# Altium PCB ZYNQ_BOARD.PcbDoc (part 5 of 9)
Units mm, origin at the board's own origin, x right, y up, seen from the top; angles counter-clockwise.
Board outline 120 x 66 mm, 10 copper layers (Top Layer, Internal Plane 1 (GND), Middle Layer 1, Middle Layer 2, Internal Plane 2 (+1.0V), Middle Layer 3, Middle Layer 4, Middle Layer 5 (PWR), Internal Plane 3 (GND), Bottom Layer), stack 0.982 mm thick; 333 components, 331 nets, 1511 pads, 1077 vias.
Unrouted connection lines stored in the file: 30.
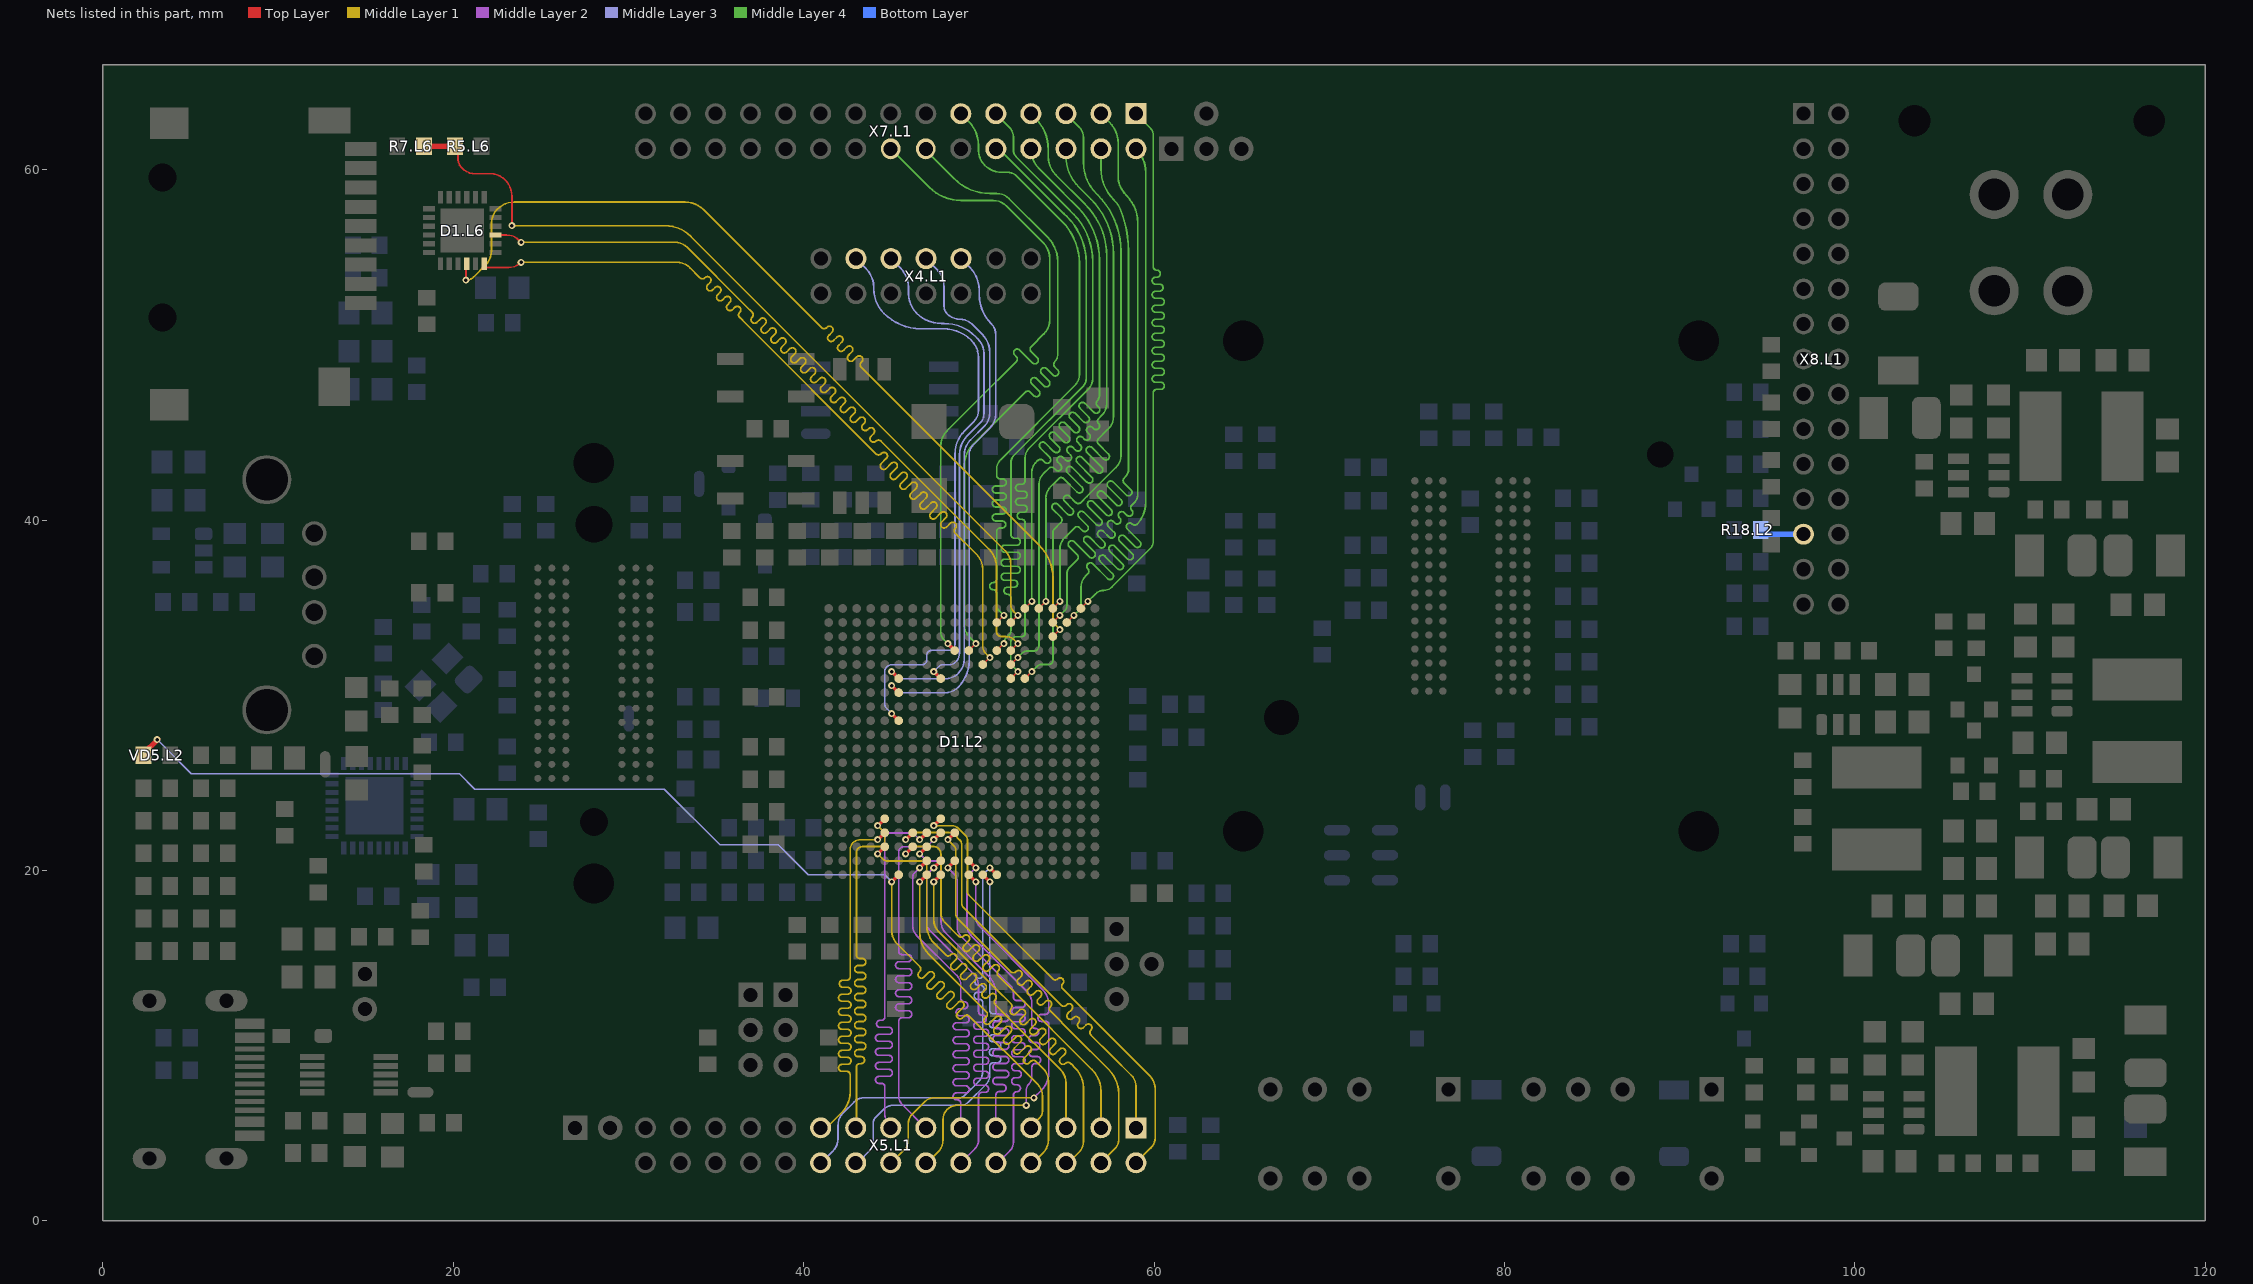
[diagram p13: the nets of this part, all layers, seen from the top]

## Via types
v1: diameter 0.4, hole 0.2, Top Layer to Bottom Layer, 1059 vias
v2: diameter 0.9, hole 0.6, Top Layer to Bottom Layer, 18 vias

## Nets (pads, with @x,y where several pads share a name; then routed paths per layer and width w, separated by ;. In a path a pad name is that pad's centre, name@x,y a point inside that pad or via, vN(x,y) a via of type N, cw(c..) or ccw(c..) an arc to the next point about the centre after c; other vN are vias at no path point) (continued)
ETH_RXCK_B501: D1.L2.B17 X7.L1.3 | length 39.3
  Top Layer w0.1: D1.L2.B17@54.22,34.16 v1(54.62,34.56)
  Middle Layer 4 w0.1: v1(54.62,34.56) 54.914,34.854 ccw(c54.658,35.11) 55.02,35.11 55.02,36.923 ; 55.02,36.924 cw(c55.577,36.924) 55.184,37.318 55.574,37.709 55.61,37.744 ccw(c55.468,37.885) 55.61,38.027 55.153,38.483 cw(c55.295,38.624) 55.153,38.766 cw(c55.295,38.624) 55.436,38.766 56.297,37.905 ccw(c56.439,38.046) 56.58,37.905 ccw(c56.439,38.046) 56.58,38.188 56.033,38.734 cw(c56.175,38.876) 56.316,39.017 56.863,38.47 ccw(c57.004,38.612) 57.146,38.47 ccw(c57.004,38.612) 57.146,38.753 56.825,39.074 cw(c56.966,39.216) 56.825,39.357 cw(c56.966,39.216) 57.108,39.357 57.429,39.036 ccw(c57.57,39.177) 57.711,39.036 ccw(c57.57,39.177) 57.711,39.319 57.39,39.64 cw(c57.532,39.781) 57.39,39.923 cw(c57.532,39.781) 57.673,39.923 57.757,39.839 ccw(c57.899,39.98) 58.04,40.122 58.014,40.148 cw(c58.155,40.289) 58.014,40.431 cw(c58.155,40.289) 58.297,40.431 58.438,40.289 ccw(c58.579,40.431) 58.721,40.289 ccw(c58.579,40.431) 58.721,40.572 cw(c58.862,40.714) 58.721,40.855 58.89,41.024 58.892,41.026 ccw(c58.47,41.444) 58.926,41.064 ccw(c58.47,41.444) 59.064,41.444 59.064,56.99 ccw(c56.895,56.99) 58.43,58.522 cw(c59.734,59.828) 58.029,59.122 cw(c58.924,59.492) 57.955,59.492 ; X7.L1.3@56.965,63.2 57.437,62.728 cw(c56.185,61.477) 57.955,61.477 57.955,59.493
ETH_RXCTL_B501: D1.L2.D13 X7.L1.10 | length 39.6
  Top Layer w0.1: D1.L2.D13@51.02,32.56 v1(51.42,32.96)
  Middle Layer 4 w0.1: X7.L1.10@50.965,60.985 X7.L1.10@50.965,61.2 cw(c50.965,60.753) 51.281,61.069 54.85,57.5 54.851,57.499 55.04,57.31 55.041,57.309 cw(c52.437,54.705) 56.12,54.705 56.12,48.072 cw(c55.529,48.072) 55.947,47.654 52,43.707 ccw(c52.42,43.287) 51.826,43.287 51.826,39.223 51.826,39.173 ccw(c52.026,39.173) 52.026,38.973 52.16,38.973 cw(c52.16,38.773) 52.16,38.573 51.471,38.573 ccw(c51.471,38.373) 51.471,38.173 52.16,38.173 cw(c52.16,37.973) 52.16,37.773 51.471,37.773 ccw(c51.471,37.573) 51.471,37.373 52.16,37.373 cw(c52.16,37.173) 52.16,36.973 51.471,36.973 ccw(c51.471,36.773) 51.471,36.573 52.005,36.573 cw(c52.005,36.373) 52.005,36.173 51.626,36.173 ccw(c51.626,35.973) 51.626,35.773 cw(c51.626,35.573) 51.826,35.573 51.826,35.288 51.826,33.683 cw(c51.524,33.683) 51.737,33.469 51.556,33.287 ccw(c51.883,32.96) v1(51.42,32.96) 51.398,33.012 v1@51.39,33.032
ETH_RXD0_B501: D1.L2.D11 X7.L1.14 | length 39.3
  Top Layer w0.1: D1.L2.D11@49.42,32.56 v1(49.82,32.96)
  Middle Layer 4 w0.1: X7.L1.14@46.965,61.2 ccw(c47.153,61.2) 47.02,61.067 48.601,59.486 ; v1(49.82,32.96) 49.82,32.965 49.436,33.349 cw(c50.066,33.979) 49.175,33.979 49.175,43.168 cw(c50.778,43.168) 49.644,44.301 52.334,46.991 52.652,47.309 cw(c52.793,47.167) 52.935,47.309 53.137,47.106 ccw(c53.279,47.248) 53.42,47.106 ccw(c53.279,47.248) 53.42,47.389 53.013,47.796 cw(c53.154,47.938) 53.013,48.079 cw(c53.154,47.938) 53.296,48.079 53.703,47.672 ccw(c53.845,47.813) 53.986,47.672 ccw(c53.845,47.813) 53.986,47.955 53.579,48.362 cw(c53.72,48.503) 53.579,48.645 cw(c53.72,48.503) 53.862,48.645 54.214,48.293 ccw(c54.355,48.434) 54.496,48.293 ccw(c54.355,48.434) 54.496,48.576 54.33,48.742 cw(c54.471,48.884) 54.304,48.994 54.437,49.195 54.454,49.24 ccw(c53.617,49.523) 54.47,49.294 ccw(c53.617,49.523) 54.5,49.523 54.5,54.758 ccw(c52.542,54.759) 53.926,56.145 51.711,58.36 ccw(c51.01,57.659) 51.01,58.65 50.619,58.65 ; 50.618,58.65 cw(c50.618,61.501) 48.602,59.485 ; 48.601,59.486 48.602,59.485
ETH_RXD1_B501: D1.L2.A16 X7.L1.6 | length 39.3
  Top Layer w0.1: D1.L2.A16@53.42,34.96 v1(53.82,35.36)
  Middle Layer 4 w0.1: v1(53.82,35.36) 53.82,41.251 cw(c54.771,41.251) 54.098,41.923 54.231,42.055 54.549,42.374 cw(c54.69,42.232) 54.832,42.374 55.595,41.611 ccw(c55.736,41.752) 55.878,41.611 ccw(c55.736,41.752) 55.878,41.893 55.049,42.722 cw(c55.19,42.863) 55.332,43.005 56.16,42.176 ccw(c56.302,42.318) 56.443,42.176 ccw(c56.302,42.318) 56.443,42.459 55.612,43.291 cw(c55.753,43.432) 55.612,43.573 cw(c55.753,43.432) 55.895,43.573 56.726,42.742 ccw(c56.868,42.883) 57.009,42.742 ccw(c56.868,42.883) 57.009,43.025 56.175,43.859 cw(c56.316,44.001) 56.175,44.142 cw(c56.316,44.001) 56.457,44.142 57.105,43.494 ccw(c57.247,43.635) 57.388,43.777 56.812,44.353 cw(c56.953,44.495) 56.812,44.636 57.331,45.156 57.383,45.208 ccw(c56.66,45.931) 57.683,45.931 57.683,55.202 ; X7.L1.6@54.965,61.2 54.965,60.797 ccw(c57.505,60.797) 55.709,59.001 56.392,58.317 56.394,58.315 cw(c53.28,55.203) 57.683,55.203
ETH_RXD2_B501: D1.L2.F15 X7.L1.5 | length 39.3
  Top Layer w0.1: D1.L2.F15@52.62,30.96 v1(53.02,31.36)
  Middle Layer 4 w0.1: v1(53.02,31.36) 53.321,31.661 cw(c53.56,31.422) 53.56,31.76 53.958,31.76 ccw(c53.959,32.033) 54.152,31.84 ccw(c53.984,32.006) 54.22,32.006 54.22,39.304 cw(c54.477,39.304) 54.295,39.485 54.649,39.839 54.684,39.874 ccw(c54.543,40.015) 54.684,40.157 54.223,40.618 cw(c54.364,40.76) 54.223,40.901 cw(c54.364,40.76) 54.506,40.901 55.057,40.349 ccw(c55.199,40.491) 55.34,40.349 ccw(c55.199,40.491) 55.34,40.632 54.888,41.084 cw(c55.029,41.226) 55.171,41.367 55.533,41.005 ccw(c55.674,41.147) 55.815,41.005 56.161,41.351 57.824,43.014 ccw(c57.147,43.692) 58.105,43.692 58.105,55.353 ; X7.L1.5@54.965,63.2 55.706,62.459 cw(c55.077,61.829) 55.967,61.829 55.967,60.425 ccw(c58.507,60.425) 56.711,58.629 56.774,58.566 56.775,58.565 cw(c53.564,55.354) 58.105,55.354
ETH_RXD3_B501: D1.L2.A15 X7.L1.8 | length 39.3
  Top Layer w0.1: D1.L2.A15@52.62,34.96 v1(53.02,35.36)
  Middle Layer 4 w0.1: X7.L1.8@52.965,61.2 ccw(c54.581,61.2) 53.438,60.057 54.844,58.652 54.846,58.65 55.631,57.865 55.633,57.863 cw(c52.618,54.85) 56.88,54.85 ; v1(53.02,35.36) 53.02,42.752 ; 53.02,42.753 cw(c53.778,42.753) 53.19,43.232 cw(c53.778,42.753) 53.223,43.27 53.243,43.29 53.366,43.413 cw(c53.508,43.272) 53.649,43.413 53.753,43.309 ccw(c53.895,43.451) 54.036,43.592 53.507,44.121 cw(c53.648,44.263) 53.507,44.404 cw(c53.648,44.263) 53.79,44.404 54.28,43.914 ccw(c54.421,44.056) 54.562,43.914 ccw(c54.421,44.056) 54.562,44.197 54.073,44.687 cw(c54.214,44.828) 54.073,44.97 cw(c54.214,44.828) 54.355,44.97 54.842,44.483 ccw(c54.984,44.624) 55.125,44.483 ccw(c54.984,44.624) 55.125,44.766 54.638,45.253 cw(c54.78,45.394) 54.638,45.536 cw(c54.78,45.394) 54.921,45.536 55.405,45.052 ccw(c55.546,45.193) 55.688,45.335 55.204,45.818 cw(c55.345,45.96) 55.204,46.101 cw(c55.345,45.96) 55.487,46.101 55.967,45.621 ccw(c56.109,45.762) 56.25,45.621 ccw(c56.109,45.762) 56.25,45.904 55.77,46.384 cw(c55.911,46.526) 55.77,46.667 cw(c55.911,46.526) 56.052,46.667 56.554,46.165 ccw(c56.695,46.307) 56.837,46.165 ccw(c56.695,46.307) 56.837,46.448 56.758,46.527 cw(c56.9,46.668) 56.751,46.802 56.758,46.81 ccw(c56.329,47.155) 56.788,46.85 ccw(c56.329,47.155) 56.88,47.155 56.88,54.849
ETH_RXER_B501: D1.L2.B13 X7.L1.11 | length 39.3
  Top Layer w0.1: D1.L2.B13@51.02,34.16 v1(51.42,34.56)
  Middle Layer 4 w0.1: X7.L1.11@48.965,63.2 49.411,62.754 49.412,62.753 ; 49.412,62.753 cw(c48.064,61.405) 49.97,61.406 ; 49.97,61.404 49.97,61.115 ccw(c51.165,61.115) 50.32,60.27 ccw(c51.323,61.273) 51.323,59.855 51.626,59.855 cw(c51.626,59.097) 52.162,59.633 54.751,57.044 cw(c52.383,54.675) 55.732,54.675 ; v1(51.42,34.56) 51.159,34.821 cw(c51.518,35.18) 51.01,35.18 51.01,35.786 51.01,35.836 ccw(c50.81,35.836) 50.81,36.036 cw(c50.81,36.236) 50.81,36.436 ccw(c50.81,36.636) 51.01,36.636 51.01,37.26 51.01,38.207 51.01,39.356 cw(c51.21,39.356) 51.21,39.556 51.327,39.556 ccw(c51.327,39.756) 51.327,39.956 50.963,39.956 cw(c50.963,40.156) 50.963,40.356 51.357,40.356 ccw(c51.357,40.556) 51.357,40.756 50.963,40.756 cw(c50.963,40.956) 50.963,41.156 51.357,41.156 ccw(c51.357,41.356) 51.357,41.556 50.963,41.556 cw(c50.963,41.756) 50.963,41.956 51.357,41.956 ccw(c51.357,42.156) 51.357,42.356 51.21,42.356 cw(c51.21,42.556) 51.01,42.556 51.01,42.606 51.01,42.898 cw(c51.803,42.899) 51.243,43.46 55.47,47.686 ccw(c54.836,48.32) 55.732,48.32 55.732,54.674
ETH_TXCK_B501: D1.L2.A19 X7.L1.1 | length 39.3
  Top Layer w0.1: D1.L2.A19@55.82,34.96 v1(56.22,35.36)
  Middle Layer 4 w0.1: v1(56.22,35.36) 56.666,35.806 cw(c57.11,35.362) 57.11,35.99 ccw(c57.11,36.668) 57.589,36.189 59.764,38.363 ccw(c59.307,38.82) 59.953,38.82 59.953,46.82 59.953,47.27 cw(c60.153,47.27) 60.153,47.47 60.379,47.47 ccw(c60.379,47.67) 60.379,47.87 60.084,47.87 cw(c60.084,48.07) 60.084,48.27 60.379,48.27 ccw(c60.379,48.47) 60.379,48.67 60.084,48.67 cw(c60.084,48.87) 60.084,49.07 60.379,49.07 ccw(c60.379,49.27) 60.379,49.47 60.084,49.47 cw(c60.084,49.67) 60.084,49.87 60.379,49.87 ccw(c60.379,50.07) 60.379,50.27 60.084,50.27 cw(c60.084,50.47) 60.084,50.67 60.379,50.67 ccw(c60.379,50.87) 60.379,51.07 60.084,51.07 cw(c60.084,51.27) 60.084,51.47 60.379,51.47 ccw(c60.379,51.67) 60.379,51.87 60.084,51.87 cw(c60.084,52.07) 60.084,52.27 60.379,52.27 ccw(c60.379,52.47) 60.379,52.67 60.084,52.67 cw(c60.084,52.87) 60.084,53.07 60.309,53.07 ccw(c60.309,53.27) 60.309,53.47 60.084,53.47 cw(c60.084,53.67) 60.084,53.87 60.153,53.87 ccw(c60.153,54.07) 60.153,54.27 cw(c60.153,54.47) 59.953,54.47 59.953,57.459 59.953,61.963 ccw(c59.354,61.963) 59.778,62.387 X7.L1.1@58.965,63.2
ETH_TXCTL_B501: D1.L2.F14 X7.L1.9 | length 39.3
  Top Layer w0.1: D1.L2.F14@51.82,30.96 v1(52.22,31.36)
  Middle Layer 4 w0.1: X7.L1.9@50.965,63.2 51.733,62.432 cw(c51.161,61.86) 51.97,61.86 51.97,61.108 ; 51.97,61.107 ccw(c52.468,61.107) 52.116,60.755 ; 52.117,60.754 55.042,57.829 55.043,57.828 55.42,57.451 cw(c52.59,54.76) 56.495,54.76 ; v1(52.22,31.36) 51.947,31.633 cw(c52.255,31.94) 51.82,31.94 51.82,33.067 cw(c52.093,33.067) 51.9,33.26 cw(c52.115,33.045) 52.115,33.349 52.433,33.349 ccw(c52.433,33.557) 52.58,33.41 ccw(c52.449,33.541) 52.634,33.541 52.634,39.241 52.634,39.851 ccw(c52.434,39.851) 52.434,40.051 52.382,40.051 cw(c52.382,40.251) 52.382,40.451 52.55,40.451 ccw(c52.55,40.651) 52.55,40.851 52.293,40.851 cw(c52.293,41.051) 52.293,41.251 52.55,41.251 ccw(c52.55,41.451) 52.55,41.651 52.293,41.651 cw(c52.293,41.851) 52.293,42.051 52.434,42.051 ccw(c52.434,42.251) 52.634,42.251 52.634,42.701 52.634,43.542 ; 52.634,43.543 cw(c53.448,43.543) 52.873,44.12 56.262,47.508 ccw(c55.698,48.072) 56.495,48.072 56.495,54.759
ETH_TXD0_B501: D1.L2.E14 X7.L1.7 | length 39.3
  Top Layer w0.1: D1.L2.E14@51.82,31.76 v1(52.22,32.16)
  Middle Layer 4 w0.1: v1(52.22,32.16) 52.487,32.427 cw(c52.76,32.154) 52.76,32.54 53.175,32.54 ccw(c53.175,32.745) 53.32,32.6 ccw(c53.054,32.866) 53.43,32.866 53.43,42.06 cw(c54.251,42.06) 53.67,42.64 53.68,42.65 53.998,42.968 cw(c54.139,42.826) 54.281,42.968 54.377,42.871 ccw(c54.519,43.012) 54.66,42.871 ccw(c54.519,43.012) 54.66,43.154 54.511,43.303 cw(c54.653,43.444) 54.794,43.586 54.943,43.437 ccw(c55.085,43.578) 55.226,43.437 ccw(c55.085,43.578) 55.226,43.719 55.075,43.871 cw(c55.216,44.012) 55.075,44.153 cw(c55.216,44.012) 55.358,44.153 55.509,44.002 ccw(c55.65,44.144) 55.792,44.002 ccw(c55.65,44.144) 55.792,44.285 55.638,44.439 cw(c55.779,44.58) 55.638,44.722 cw(c55.779,44.58) 55.921,44.722 56.016,44.626 ccw(c56.158,44.768) 56.299,44.909 56.201,45.007 cw(c56.342,45.149) 56.201,45.29 cw(c56.342,45.149) 56.484,45.29 56.543,45.231 ccw(c56.685,45.372) 56.826,45.231 ccw(c56.685,45.372) 56.826,45.513 cw(c56.968,45.655) 56.826,45.796 57.017,45.987 57.073,46.049 57.122,46.112 ccw(c56.354,46.65) 57.15,46.155 ccw(c56.354,46.65) 57.292,46.65 57.292,55.074 ; X7.L1.7@52.965,63.2 53.216,62.949 cw(c51.42,61.153) 53.96,61.153 53.96,60.744 ccw(c55.435,60.744) 54.392,59.701 56.07,58.024 56.071,58.022 cw(c53.123,55.075) 57.292,55.075
ETH_TXD1_B501: D1.L2.B18 X7.L1.2 | length 39.3
  Top Layer w0.1: D1.L2.B18@55.02,34.16 v1(55.42,34.56)
  Middle Layer 4 w0.1: v1(55.42,34.56) 55.681,34.821 ; 55.682,34.822 ccw(c55.323,35.18) 55.83,35.18 55.83,36.17 cw(c56.76,36.17) 56.102,36.828 56.182,36.908 56.218,36.943 ccw(c56.076,37.085) 56.218,37.226 cw(c56.359,37.368) 56.218,37.509 cw(c56.359,37.368) 56.5,37.509 57.34,36.669 ccw(c57.482,36.811) 57.623,36.669 ccw(c57.482,36.811) 57.623,36.952 56.908,37.667 cw(c57.049,37.808) 57.191,37.95 57.906,37.235 ccw(c58.047,37.376) 58.189,37.235 ccw(c58.047,37.376) 58.189,37.518 57.474,38.233 cw(c57.615,38.374) 57.474,38.515 cw(c57.615,38.374) 57.757,38.515 58.472,37.8 ccw(c58.613,37.942) 58.754,37.8 ccw(c58.613,37.942) 58.754,38.083 58.039,38.798 cw(c58.181,38.94) 58.039,39.081 cw(c58.181,38.94) 58.322,39.081 58.901,38.502 ccw(c59.043,38.644) 59.184,38.785 58.471,39.498 cw(c58.613,39.639) 58.471,39.78 cw(c58.613,39.639) 58.754,39.78 ccw(c58.896,39.922) 59.051,39.795 59.207,39.987 59.224,40.013 ccw(c57.62,41.036) 59.251,40.057 ccw(c57.62,41.036) 59.522,41.036 59.522,59.855 ccw(c57.62,59.855) X7.L1.2@58.965,61.2 ; X7.L1.2@58.965,60.968 X7.L1.2@58.965,61.027
ETH_TXD2_B501: D1.L2.D10 X7.L1.16 | length 39.3
  Top Layer w0.2: v1(48.22,32.96) D1.L2.D10@48.62,32.56
  Middle Layer 4 w0.1: X7.L1.16@44.965,61.2 47.17,58.995 ccw(c48.966,60.791) 48.966,58.251 50.807,58.251 cw(c50.807,57.182) 51.562,57.938 53.67,55.83 cw(c52.777,54.937) 54.04,54.937 54.04,51.43 cw(c52.91,51.43) 53.709,50.631 53.015,49.937 52.98,49.902 ccw(c53.121,49.76) 52.98,49.619 53.331,49.268 cw(c53.19,49.126) 53.331,48.985 cw(c53.19,49.126) 53.048,48.985 52.323,49.71 ccw(c52.182,49.569) 52.04,49.71 ccw(c52.182,49.569) 52.04,49.427 52.131,49.336 cw(c51.99,49.195) 52.131,49.053 49.97,46.892 48.178,45.1 ccw(c49.05,44.229) 47.818,44.229 47.818,33.625 ccw(c48.451,33.625) 48.003,33.177 v1(48.22,32.96)
ETH_TXD3_B501: D1.L2.A17 X7.L1.4 | length 39.3
  Top Layer w0.1: D1.L2.A17@54.22,34.96 v1(54.62,35.36)
  Middle Layer 4 w0.1: v1(54.62,35.36) 54.62,38.349 ; 54.62,38.35 cw(c55.549,38.35) 54.893,39.008 55.089,39.204 55.459,39.574 cw(c55.6,39.432) 55.742,39.574 55.904,39.412 ccw(c56.045,39.553) 56.186,39.412 ccw(c56.045,39.553) 56.186,39.694 ; 56.186,39.694 55.714,40.167 cw(c55.855,40.309) 55.997,40.45 56.695,39.752 ccw(c56.837,39.893) 56.978,39.752 ccw(c56.837,39.893) 56.978,40.034 56.247,40.766 cw(c56.388,40.907) 56.247,41.049 cw(c56.388,40.907) 56.529,41.049 57.261,40.317 ccw(c57.402,40.459) 57.544,40.317 ccw(c57.402,40.459) 57.544,40.6 56.812,41.331 cw(c56.954,41.473) 56.812,41.614 cw(c56.954,41.473) 57.095,41.614 57.826,40.883 ccw(c57.968,41.024) 58.109,41.166 57.378,41.897 cw(c57.519,42.039) 57.378,42.18 cw(c57.519,42.039) 57.661,42.18 58.392,41.449 ccw(c58.534,41.59) 58.675,41.449 ccw(c58.534,41.59) 58.675,41.731 58.287,42.119 cw(c58.429,42.261) 58.287,42.402 58.323,42.437 58.358,42.473 ccw(c57.926,42.906) 58.538,42.906 58.538,55.358 ccw(c52.273,55.358) 58.061,57.754 ccw(c56.646,57.167) 57.729,58.251 57.709,58.271 cw(c59.505,60.067) 56.965,60.067 X7.L1.4@56.965,61.2
FPGA_BANK13.IO_L6N_T0_VREF_13: D1.L2.V5 X5.L1.5 | length 26.5
  Top Layer w0.2: v1(44.22,20.96) D1.L2.V5@44.62,21.36
  Middle Layer 1 w0.1: v1(44.22,20.96) 44.545,20.635 ccw(c44.75,20.84) 44.75,20.55 46.689,20.55 ; 46.69,20.55 cw(c46.69,20.234) 46.913,20.458 ; 46.914,20.457 cw(c46.655,20.2) 47.02,20.2 ; 47.02,20.199 47.02,16.86 ccw(c48.45,16.86) 47.439,15.849 48.068,15.22 48.103,15.185 ccw(c48.244,15.326) 48.386,15.185 48.394,15.193 cw(c48.535,15.051) 48.677,15.193 cw(c48.535,15.051) 48.677,14.91 48.443,14.677 ccw(c48.585,14.535) 48.443,14.394 ccw(c48.585,14.535) 48.726,14.394 48.96,14.627 cw(c49.101,14.486) 49.242,14.627 cw(c49.101,14.486) 49.242,14.344 49.009,14.111 ccw(c49.15,13.969) 49.009,13.828 ccw(c49.15,13.969) 49.292,13.828 49.525,14.061 cw(c49.667,13.92) 49.808,14.061 cw(c49.667,13.92) 49.808,13.779 49.575,13.545 ccw(c49.716,13.404) 49.575,13.262 ccw(c49.716,13.404) 49.858,13.262 50.082,13.487 cw(c50.224,13.346) 50.365,13.487 cw(c50.224,13.346) 50.365,13.204 50.224,13.063 ccw(c50.366,12.922) 50.224,12.78 ccw(c50.366,12.922) 50.507,12.78 50.649,12.922 cw(c50.79,12.781) 50.931,12.922 cw(c50.79,12.781) 50.931,12.639 ccw(c51.073,12.498) 50.931,12.356 51.623,11.665 54.667,8.621 cw(c53.947,7.901) 54.965,7.901 X5.L1.5@54.965,5.32
FPGA_BANK13.IO_L11N_T1_SRCC_13: D1.L2.V7 X5.L1.3 | length 26.4
  Top Layer w0.2: v1(45.82,20.96) D1.L2.V7@46.22,21.36
  Middle Layer 1 w0.1: v1(45.82,20.96) 46.187,21.327 cw(c46.291,21.223) 46.291,21.37 47.438,21.37 ; 47.439,21.37 cw(c47.439,21.009) 47.693,21.265 cw(c47.367,20.937) 47.83,20.937 ; 47.83,20.936 47.83,17.581 ccw(c48.592,17.58) 48.053,17.041 ; 48.054,17.04 48.8,16.294 48.835,16.259 ccw(c48.977,16.4) 49.118,16.259 49.128,16.269 cw(c49.27,16.128) 49.411,16.269 cw(c49.27,16.128) 49.411,15.986 49.151,15.726 ccw(c49.292,15.584) 49.151,15.443 ccw(c49.292,15.584) 49.434,15.443 49.694,15.703 cw(c49.835,15.562) 49.977,15.703 cw(c49.835,15.562) 49.977,15.421 49.716,15.16 ccw(c49.858,15.019) 49.716,14.877 ccw(c49.858,15.019) 49.999,14.877 50.26,15.138 cw(c50.401,14.996) 50.543,15.138 cw(c50.401,14.996) 50.543,14.855 50.282,14.594 ccw(c50.424,14.453) 50.282,14.312 ccw(c50.424,14.453) 50.565,14.312 50.825,14.572 cw(c50.967,14.431) 51.108,14.572 cw(c50.967,14.431) 51.108,14.289 51.098,14.279 ccw(c51.24,14.138) 51.098,13.996 51.919,13.176 56.447,8.648 cw(c55.195,7.396) 56.965,7.396 X5.L1.3@56.965,5.32
FPGA_BANK13.IO_L11P_T1_SRCC_13: D1.L2.U7 X5.L1.1 | length 26.5
  Top Layer w0.2: v1(45.82,21.76) D1.L2.U7@46.22,22.16
  Middle Layer 1 w0.1: v1(45.82,21.76) 46.117,22.057 cw(c46.39,21.784) 46.39,22.17 48.31,22.17 cw(c48.31,21.748) 48.609,22.046 48.913,21.742 48.914,21.741 cw(c48.677,21.504) 49.012,21.504 ; 49.012,21.503 49.012,18.156 ccw(c49.393,18.156) 49.123,17.887 54.66,12.35 54.695,12.315 ccw(c54.837,12.456) 54.978,12.315 55.004,12.341 cw(c55.145,12.199) 55.287,12.341 cw(c55.145,12.199) 55.287,12.058 55.076,11.847 ccw(c55.217,11.706) 55.076,11.564 ccw(c55.217,11.706) 55.359,11.564 55.402,11.608 cw(c55.544,11.466) 55.685,11.608 cw(c55.544,11.466) 55.685,11.325 ccw(c55.826,11.183) 55.685,11.042 ccw(c55.826,11.183) 55.968,11.042 56.109,11.184 cw(c56.251,11.042) 56.392,11.184 cw(c56.251,11.042) 56.392,10.901 ccw(c56.534,10.759) 56.392,10.618 57.646,9.364 58.707,8.303 cw(c58.084,7.68) 58.965,7.68 X5.L1.1@58.965,5.32
FPGA_BANK13.IO_L12N_T1_MRCC_13: D1.L2.U10 X5.L1.4 | length 26.5
  Top Layer w0.2: v1(48.22,21.76) D1.L2.U10@48.62,22.16
  Middle Layer 1 w0.1: v1(48.22,21.76) 48.589,21.391 48.59,21.39 cw(c48.385,21.185) 48.675,21.185 ; 48.675,21.184 48.675,17.552 ccw(c49.102,17.552) 48.8,17.25 51.79,14.26 51.825,14.225 ccw(c51.967,14.366) 52.108,14.225 52.122,14.238 cw(c52.263,14.097) 52.405,14.238 cw(c52.263,14.097) 52.405,13.955 52.243,13.794 ccw(c52.385,13.653) 52.243,13.511 ccw(c52.385,13.653) 52.526,13.511 52.687,13.672 cw(c52.829,13.531) 52.97,13.672 cw(c52.829,13.531) 52.97,13.39 52.809,13.228 ccw(c52.951,13.087) 52.809,12.946 ccw(c52.951,13.087) 53.092,12.946 53.238,13.091 cw(c53.379,12.95) 53.52,13.091 cw(c53.379,12.95) 53.52,12.808 53.381,12.669 ccw(c53.522,12.528) 53.381,12.386 ccw(c53.522,12.528) 53.664,12.386 53.805,12.528 cw(c53.947,12.386) 54.088,12.528 cw(c53.947,12.386) 54.088,12.245 ; 54.088,12.245 ccw(c54.23,12.103) 54.088,11.962 55.355,10.695 57.407,8.643 cw(c56.024,7.26) 57.98,7.26 57.98,4.644 cw(c57.233,4.644) 57.761,4.116 X5.L1.4@56.965,3.32
FPGA_BANK13.IO_L12P_T1_MRCC_13: D1.L2.T9 X5.L1.2 | length 26.6
  Top Layer w0.2: v1(47.42,22.56) D1.L2.T9@47.82,22.96
  Middle Layer 1 w0.1: v1(47.42,22.56) 48.46,22.56 cw(c48.46,22.04) 48.827,22.408 49.216,22.019 49.218,22.018 cw(c48.898,21.698) 49.35,21.698 ; 49.35,21.697 49.35,18.78 ccw(c49.594,18.78) 49.422,18.607 52.392,15.637 54.213,13.816 ccw(c54.354,13.957) 54.496,13.816 cw(c54.637,13.675) 54.779,13.816 cw(c54.637,13.675) 54.779,13.533 ccw(c54.92,13.392) 54.779,13.25 55.097,12.932 59.739,8.29 cw(c58.961,7.514) 60.06,7.514 60.06,4.76 cw(c59.227,4.76) 59.816,4.171 X5.L1.2@58.965,3.32
FPGA_BANK13.IO_L13N_T2_MRCC_13: D1.L2.Y6 VD5.L2.2 X5.L1.7 | length 70.7
  Top Layer w0.2: v1(45.02,19.36) D1.L2.Y6@45.42,19.76
  Top Layer w0.3: VD5.L2.2@2.32,26.68 v1@3.14,27.5
  Middle Layer 3 w0.1: v1(3.09,27.48) 5.04,25.53 20.348,25.53 21.23,24.648 32.04,24.648 35.218,21.471 38.54,21.471 40.255,19.756 44.624,19.756 v1(45.02,19.36)
  Middle Layer 1 w0.1: 45.02,16.553 ccw(c46.054,16.553) 45.323,15.822 ; 45.02,16.554 v1(45.02,19.36) ; X5.L1.7@52.965,5.32 cw(c53.146,5.32) 53.018,5.448 53.49,5.92 ccw(c53.164,6.246) 53.625,6.246 53.625,7.127 ccw(c52.677,7.127) 53.347,7.797 49.485,11.66 49.449,11.696 ccw(c49.308,11.554) 49.167,11.696 49.064,11.593 cw(c48.923,11.735) 48.781,11.593 cw(c48.923,11.735) 48.781,11.876 49.095,12.19 ccw(c48.953,12.331) 49.095,12.472 ccw(c48.953,12.331) 48.812,12.472 48.498,12.159 cw(c48.357,12.3) 48.216,12.159 cw(c48.357,12.3) 48.216,12.442 48.529,12.755 ccw(c48.388,12.897) 48.529,13.038 ccw(c48.388,12.897) 48.246,13.038 47.933,12.724 cw(c47.791,12.866) 47.65,12.724 cw(c47.791,12.866) 47.65,13.007 47.964,13.321 ccw(c47.822,13.462) 47.964,13.604 ccw(c47.822,13.462) 47.681,13.604 47.367,13.29 cw(c47.226,13.432) 47.084,13.29 cw(c47.226,13.432) 47.084,13.573 47.398,13.887 ccw(c47.256,14.028) 47.398,14.17 ccw(c47.256,14.028) 47.115,14.17 46.86,13.915 cw(c46.719,14.056) 46.577,13.915 cw(c46.719,14.056) 46.577,14.198 46.621,14.241 ccw(c46.48,14.383) 46.621,14.524 45.909,15.236 45.324,15.821 ; 45.323,15.822 45.324,15.821
FPGA_BANK13.IO_L14N_T2_SRCC_13: D1.L2.Y8 X5.L1.8 | length 26.5
  Top Layer w0.2: v1(46.62,19.36) D1.L2.Y8@47.02,19.76
  Middle Layer 1 w0.1: v1(46.62,19.36) 46.62,16.464 ccw(c48.364,16.464) 47.131,15.231 50.103,12.259 50.421,11.94 cw(c50.28,11.799) 50.421,11.658 50.335,11.571 ccw(c50.476,11.429) 50.335,11.288 ccw(c50.476,11.429) 50.617,11.288 50.958,11.629 cw(c51.1,11.487) 51.241,11.629 cw(c51.1,11.487) 51.241,11.346 50.9,11.005 ccw(c51.042,10.864) 50.9,10.722 ccw(c51.042,10.864) 51.183,10.722 51.524,11.063 cw(c51.665,10.922) 51.807,11.063 cw(c51.665,10.922) 51.807,10.78 51.466,10.439 ccw(c51.607,10.298) 51.466,10.157 ccw(c51.607,10.298) 51.749,10.157 52.089,10.497 cw(c52.231,10.356) 52.372,10.497 cw(c52.231,10.356) 52.372,10.214 52.032,9.874 ccw(c52.173,9.732) 52.032,9.591 ccw(c52.173,9.732) 52.315,9.591 52.655,9.932 cw(c52.797,9.79) 52.938,9.932 cw(c52.797,9.79) 52.938,9.649 52.597,9.308 ccw(c52.739,9.167) 52.597,9.025 ccw(c52.739,9.167) 52.88,9.025 52.967,9.112 cw(c53.108,8.971) 53.25,9.112 53.671,8.691 53.775,8.569 cw(c52.949,7.969) 53.804,8.527 cw(c52.949,7.969) 53.97,7.969 53.97,4.633 cw(c52.877,4.633) 53.65,3.86 53.213,3.423 cw(c52.965,3.67) X5.L1.8@52.965,3.32 X5.L1.8@53.12,3.32
FPGA_BANK13.IO_L14P_T2_SRCC_13: D1.L2.Y9 X5.L1.6 | length 26.5
  Top Layer w0.2: v1(47.42,19.36) D1.L2.Y9@47.82,19.76
  Middle Layer 1 w0.1: v1(47.42,19.36) 47.42,17.179 ccw(c48.327,17.179) 47.686,16.538 50.936,13.287 51.828,12.395 cw(c51.687,12.254) 51.828,12.112 ccw(c51.97,11.971) 51.828,11.829 ccw(c51.97,11.971) 52.111,11.829 52.312,12.03 cw(c52.453,11.888) 52.594,12.03 cw(c52.453,11.888) 52.594,11.747 52.392,11.545 ccw(c52.534,11.403) 52.392,11.262 ccw(c52.534,11.403) 52.675,11.262 52.911,11.498 cw(c53.053,11.357) 53.194,11.498 cw(c53.053,11.357) 53.194,11.215 52.958,10.979 ccw(c53.099,10.838) 52.958,10.696 ccw(c53.099,10.838) 53.241,10.696 53.477,10.932 cw(c53.618,10.791) 53.76,10.932 cw(c53.618,10.791) 53.76,10.65 53.524,10.413 ccw(c53.665,10.272) 53.524,10.13 ccw(c53.665,10.272) 53.806,10.13 54.043,10.367 cw(c54.184,10.225) 54.326,10.367 cw(c54.184,10.225) 54.326,10.084 54.089,9.848 ccw(c54.231,9.706) 54.089,9.565 ccw(c54.231,9.706) 54.372,9.565 54.608,9.801 cw(c54.75,9.66) 54.891,9.801 cw(c54.75,9.66) 54.891,9.518 54.655,9.282 ccw(c54.796,9.14) 54.655,8.999 ccw(c54.796,9.14) 54.938,8.999 54.94,9.001 cw(c55.081,8.86) 55.223,9.001 55.258,8.966 55.5,8.723 cw(c54.365,7.589) 55.97,7.589 55.97,4.548 cw(c55.082,4.548) 55.71,3.92 55.213,3.423 cw(c54.965,3.67) X5.L1.6@54.965,3.32
FPGA_BANK13.IO_L15N_T2_DQS_13: D1.L2.W8 X5.L1.11 | length 26.4
  Top Layer w0.2: v1(46.62,20.16) D1.L2.W8@47.02,20.56
  Middle Layer 2 w0.1: 46.22,16.828 ccw(c46.939,16.828) 46.43,16.319 46.431,16.319 48.74,14.01 cw(c48.197,13.467) 48.965,13.467 48.965,13.11 48.965,12.713 ccw(c49.165,12.713) 49.165,12.513 cw(c49.165,12.313) 49.165,12.113 48.895,12.113 ccw(c48.895,11.913) 48.895,11.713 49.243,11.713 cw(c49.243,11.513) 49.243,11.313 48.725,11.313 ccw(c48.725,11.113) 48.725,10.913 49.243,10.913 cw(c49.243,10.713) 49.243,10.513 48.725,10.513 ccw(c48.725,10.313) 48.725,10.113 49.243,10.113 cw(c49.243,9.913) 49.243,9.713 48.725,9.713 ccw(c48.725,9.513) 48.725,9.313 49.243,9.313 cw(c49.243,9.113) 49.243,8.913 48.725,8.913 ccw(c48.725,8.713) 48.725,8.513 49.243,8.513 cw(c49.243,8.313) 49.243,8.113 48.725,8.113 ccw(c48.725,7.913) 48.725,7.713 49.243,7.713 cw(c49.243,7.513) 49.243,7.313 48.725,7.313 ccw(c48.725,7.113) 48.725,6.913 48.765,6.913 cw(c48.765,6.713) 48.965,6.713 48.965,6.663 X5.L1.11@48.965,5.32 ; 46.22,16.829 46.22,19.64 cw(c46.51,19.64) 46.305,19.845 v1(46.62,20.16)
FPGA_BANK13.IO_L15P_T2_DQS_13: D1.L2.V8 X5.L1.9 | length 26.4
  Top Layer w0.2: v1(46.62,20.96) D1.L2.V8@47.02,21.36
  Middle Layer 2 w0.1: v1(46.62,20.96) 46.959,20.621 ccw(c47.13,20.791) 47.13,20.55 47.591,20.55 cw(c47.591,20.311) 47.76,20.48 cw(c47.588,20.308) 47.831,20.308 47.831,17.117 ccw(c48.817,17.117) 48.12,16.42 50.535,14.005 cw(c49.497,12.967) 50.965,12.967 50.965,12.039 50.965,11.989 ccw(c51.165,11.989) 51.165,11.789 51.503,11.789 cw(c51.503,11.589) 51.503,11.389 50.998,11.389 ccw(c50.998,11.189) 50.998,10.989 51.503,10.989 cw(c51.503,10.789) 51.503,10.589 50.998,10.589 ccw(c50.998,10.389) 50.998,10.189 51.503,10.189 cw(c51.503,9.989) 51.503,9.789 50.998,9.789 ccw(c50.998,9.589) 50.998,9.389 51.503,9.389 cw(c51.503,9.189) 51.503,8.989 50.998,8.989 ccw(c50.998,8.789) 50.998,8.589 51.503,8.589 cw(c51.503,8.389) 51.503,8.189 50.998,8.189 ccw(c50.998,7.989) 50.998,7.789 51.346,7.789 cw(c51.346,7.589) 51.346,7.389 51.165,7.389 ccw(c51.165,7.189) 50.965,7.189 50.965,6.783 X5.L1.9@50.965,5.32
FPGA_BANK13.IO_L16N_T2_13: D1.L2.W9 X5.L1.12 | length 26.4
  Top Layer w0.2: v1(47.42,20.16) D1.L2.W9@47.82,20.56
  Middle Layer 2 w0.1: v1(47.42,20.16) 47.105,19.845 ccw(c47.31,19.64) 47.02,19.64 47.02,16.992 ccw(c47.532,16.992) 47.17,16.63 49.661,14.139 cw(c48.891,13.369) 49.98,13.369 49.98,12.3 49.98,11.944 ccw(c50.18,11.944) 50.18,11.744 50.213,11.744 cw(c50.213,11.544) 50.213,11.344 49.903,11.344 ccw(c49.903,11.144) 49.903,10.944 50.353,10.944 cw(c50.353,10.744) 50.353,10.544 49.903,10.544 ccw(c49.903,10.344) 49.903,10.144 50.353,10.144 cw(c50.353,9.944) 50.353,9.744 49.903,9.744 ccw(c49.903,9.544) 49.903,9.344 50.353,9.344 cw(c50.353,9.144) 50.353,8.944 49.903,8.944 ccw(c49.903,8.744) 49.903,8.544 50.353,8.544 cw(c50.353,8.344) 50.353,8.144 49.903,8.144 ccw(c49.903,7.944) 49.903,7.744 50.353,7.744 cw(c50.353,7.544) 50.353,7.344 50.18,7.344 ccw(c50.18,7.144) 49.98,7.144 49.98,6.694 49.98,4.63 cw(c49.268,4.63) 49.771,4.126 X5.L1.12@48.965,3.32
FPGA_BANK13.IO_L16P_T2_13: D1.L2.W10 X5.L1.10 | length 26.4
  Top Layer w0.2: v1(48.22,20.16) D1.L2.W10@48.62,20.56
  Middle Layer 2 w0.1: v1(48.22,20.16) 48.612,19.768 cw(c48.253,19.41) 48.76,19.41 48.76,16.767 ; 48.76,16.766 ccw(c49.496,16.766) 48.976,16.245 ; 48.976,16.245 51.761,13.46 51.762,13.459 cw(c51.267,12.964) 51.967,12.964 51.967,12.828 51.967,12.778 ccw(c52.167,12.778) 52.167,12.578 52.432,12.578 cw(c52.432,12.378) 52.432,12.178 52.07,12.178 ccw(c52.07,11.978) 52.07,11.778 52.432,11.778 cw(c52.432,11.578) 52.432,11.378 52.07,11.378 ccw(c52.07,11.178) 52.07,10.978 52.432,10.978 cw(c52.432,10.778) 52.432,10.578 52.07,10.578 ccw(c52.07,10.378) 52.07,10.178 52.432,10.178 cw(c52.432,9.978) 52.432,9.778 52.07,9.778 ccw(c52.07,9.578) 52.07,9.378 52.432,9.378 cw(c52.432,9.178) 52.432,8.978 52.07,8.978 ccw(c52.07,8.778) 52.07,8.578 52.218,8.578 cw(c52.218,8.378) 52.218,8.178 52.07,8.178 ccw(c52.07,7.978) 52.07,7.778 52.167,7.778 cw(c52.167,7.578) 52.167,7.378 ccw(c52.167,7.178) 51.967,7.178 51.967,6.514 51.967,4.485 cw(c51.295,4.485) 51.77,4.01 51.161,3.401 cw(c50.965,3.598) X5.L1.10@50.965,3.32
FPGA_BANK13.IO_L17N_T2_13: D1.L2.U8 X5.L1.15 | length 26.4
  Top Layer w0.2: v1(46.62,21.76) D1.L2.U8@47.02,22.16
  Middle Layer 2 w0.1: X5.L1.15@44.965,5.32 cw(c45.774,6.129) 44.63,6.129 44.63,7.604 44.63,7.654 ccw(c44.43,7.654) 44.43,7.854 44.296,7.854 cw(c44.296,8.054) 44.296,8.254 44.858,8.254 ccw(c44.858,8.454) 44.858,8.654 44.296,8.654 cw(c44.296,8.854) 44.296,9.054 44.858,9.054 ccw(c44.858,9.254) 44.858,9.454 44.296,9.454 cw(c44.296,9.654) 44.296,9.854 44.858,9.854 ccw(c44.858,10.054) 44.858,10.254 44.296,10.254 cw(c44.296,10.454) 44.296,10.654 44.858,10.654 ccw(c44.858,10.854) 44.858,11.054 44.356,11.054 cw(c44.356,11.254) 44.356,11.454 44.43,11.454 ccw(c44.43,11.654) 44.63,11.654 44.63,13.91 44.63,21.817 cw(c44.975,21.817) 44.731,22.061 44.75,22.08 cw(c44.919,21.911) 44.919,22.15 46.1,22.15 cw(c46.1,21.837) 46.322,22.058 46.323,22.057 v1(46.62,21.76)
FPGA_BANK13.IO_L17P_T2_13: D1.L2.U9 X5.L1.13 | length 26.4
  Top Layer w0.2: v1(47.42,21.76) D1.L2.U9@47.82,22.16
  Middle Layer 2 w0.1: X5.L1.13@46.965,5.32 cw(c46.965,5.356) 46.939,5.331 45.62,6.65 cw(c46.103,7.133) 45.42,7.133 45.42,10.951 45.42,11.401 cw(c45.62,11.401) 45.62,11.601 45.966,11.601 ccw(c45.966,11.801) 45.966,12.001 45.441,12.001 cw(c45.441,12.201) 45.441,12.401 45.966,12.401 ccw(c45.966,12.601) 45.966,12.801 45.441,12.801 cw(c45.441,13.001) 45.441,13.201 45.966,13.201 ccw(c45.966,13.401) 45.966,13.601 45.441,13.601 cw(c45.441,13.801) 45.441,14.001 45.966,14.001 ccw(c45.966,14.201) 45.966,14.401 45.441,14.401 cw(c45.441,14.601) 45.441,14.801 45.959,14.801 ccw(c45.959,15.001) 45.959,15.201 45.62,15.201 cw(c45.62,15.401) 45.42,15.401 45.42,16.737 45.42,21.05 cw(c45.744,21.05) 45.514,21.278 cw(c45.71,21.084) 45.71,21.36 46.92,21.36 ccw(c46.92,21.601) 47.091,21.431 v1(47.42,21.76)
FPGA_BANK13.IO_L18N_T2_13: D1.L2.Y11 X5.L1.16 | length 26.3
  Top Layer w0.2: D1.L2.Y11@49.42,19.76 v1(49.82,19.36)
  Middle Layer 1 w0.1: X5.L1.16@44.965,3.32 ccw(c44.965,3.38) 45.008,3.338 45.8,4.13 ccw(c45.39,4.54) 45.97,4.54 45.97,5.559 cw(c46.721,5.559) 46.19,6.09 46.927,6.827 cw(c47.409,6.346) 47.409,7.027 v1(53.128,7.027)
  Middle Layer 2 w0.1: v1(49.82,19.36) 49.82,17.33 ccw(c50.544,17.33) 50.032,16.818 53.616,13.234 53.617,13.233 cw(c52.717,12.333) 53.984,12.459 cw(c52.717,12.333) 53.988,12.409 53.99,12.333 53.99,11.992 cw(c53.79,11.992) 53.79,11.792 53.565,11.792 ccw(c53.565,11.592) 53.565,11.392 53.79,11.392 cw(c53.79,11.192) 53.99,11.192 53.99,11.142 53.99,8.48 cw(c52.563,8.48) 53.572,7.471 v1(53.128,7.027)
FPGA_BANK13.IO_L18P_T2_13: D1.L2.W11 X5.L1.14 | length 26.3
  Top Layer w0.2: D1.L2.W11@49.42,20.56 v1(49.82,20.16)
  Middle Layer 1 w0.1: X5.L1.14@46.965,3.32 ccw(c46.965,3.525) 47.11,3.38 47.65,3.92 ccw(c46.926,4.644) 47.95,4.644 47.95,5.808 ; 47.95,5.809 cw(c48.724,5.809) 48.176,6.355 cw(c48.767,5.763) 48.767,6.6 v1(52.7,6.6) v1@52.767,6.6
  Middle Layer 2 w0.1: v1(49.82,20.16) 49.532,19.872 ccw(c50.044,19.36) 49.32,19.36 49.32,16.85 ccw(c50.071,16.85) 49.54,16.319 52.711,13.148 cw(c51.964,12.401) 53.02,12.401 53.02,12.293 53.02,11.189 ccw(c53.22,11.189) 53.22,10.989 cw(c53.22,10.789) 53.22,10.589 53.055,10.589 ccw(c53.055,10.389) 53.055,10.189 53.278,10.189 cw(c53.278,9.989) 53.278,9.789 53.055,9.789 ccw(c53.055,9.589) 53.055,9.389 53.322,9.389 cw(c53.322,9.189) 53.322,8.989 53.22,8.989 ccw(c53.22,8.789) 53.02,8.789 53.02,8.339 53.02,8.235 cw(c52.405,8.235) 52.84,7.8 ccw(c53.178,7.462) 52.7,7.462 v1(52.7,6.6)
FPGA_BANK13.IO_L19N_T3_VREF_13: D1.L2.U5 X5.L1.19 | length 26.5
  Top Layer w0.2: v1(44.22,21.76) D1.L2.U5@44.62,22.16
  Middle Layer 1 w0.1: X5.L1.19@40.965,5.32 ccw(c40.965,6.113) 41.526,5.552 42.163,6.19 ccw(c40.986,7.368) 42.651,7.368 42.651,8.29 42.651,8.34 ccw(c42.451,8.34) 42.451,8.54 42.187,8.54 cw(c42.187,8.74) 42.187,8.94 42.497,8.94 ccw(c42.497,9.14) 42.497,9.34 42.187,9.34 cw(c42.187,9.54) 42.187,9.74 42.497,9.74 ccw(c42.497,9.94) 42.497,10.14 42.187,10.14 cw(c42.187,10.34) 42.187,10.54 42.497,10.54 ccw(c42.497,10.74) 42.497,10.94 42.187,10.94 cw(c42.187,11.14) 42.187,11.34 42.497,11.34 ccw(c42.497,11.54) 42.497,11.74 42.187,11.74 cw(c42.187,11.94) 42.187,12.14 42.497,12.14 ccw(c42.497,12.34) 42.497,12.54 42.187,12.54 cw(c42.187,12.74) 42.187,12.94 42.497,12.94 ccw(c42.497,13.14) 42.497,13.34 42.231,13.34 cw(c42.231,13.54) 42.231,13.74 42.451,13.74 ccw(c42.451,13.94) 42.651,13.94 42.651,14.446 42.651,21.209 cw(c43.174,21.209) 42.804,21.578 cw(c43.241,21.142) 43.241,21.76 v1(44.22,21.76)
FPGA_BANK13.IO_L19P_T3_13: D1.L2.T5 X5.L1.17 | length 26.4
  Top Layer w0.2: v1(44.22,22.56) D1.L2.T5@44.62,22.96
  Middle Layer 1 w0.1: X5.L1.17@43.026,5.381 cw(c43.069,5.424) 43.007,5.424 43.007,8.29 43.007,8.781 cw(c43.207,8.781) 43.207,8.981 43.268,8.981 ccw(c43.268,9.181) 43.268,9.381 43.103,9.381 cw(c43.103,9.581) 43.103,9.781 43.342,9.781 ccw(c43.342,9.981) 43.342,10.181 43.103,10.181 cw(c43.103,10.381) 43.103,10.581 43.342,10.581 ccw(c43.342,10.781) 43.342,10.981 43.103,10.981 cw(c43.103,11.181) 43.103,11.381 43.342,11.381 ccw(c43.342,11.581) 43.342,11.781 43.103,11.781 cw(c43.103,11.981) 43.103,12.181 43.342,12.181 ccw(c43.342,12.381) 43.342,12.581 43.103,12.581 cw(c43.103,12.781) 43.103,12.981 43.342,12.981 ccw(c43.342,13.181) 43.342,13.381 43.103,13.381 cw(c43.103,13.581) 43.103,13.781 43.342,13.781 ccw(c43.342,13.981) 43.342,14.181 43.103,14.181 cw(c43.103,14.381) 43.103,14.581 43.342,14.581 ccw(c43.342,14.781) 43.342,14.981 43.207,14.981 cw(c43.207,15.181) 43.007,15.181 43.007,15.231 43.007,21.036 cw(c43.33,21.037) 43.103,21.266 cw(c43.356,21.011) 43.356,21.37 44.396,21.37 ccw(c44.396,21.609) 44.565,21.44 ccw(c44.407,21.598) 44.63,21.598 44.63,21.98 ccw(c44.22,21.98) 44.51,22.27 v1(44.22,22.56)
FPGA_BANK13.IO_L20N_T3_13: D1.L2.Y13 X5.L1.20 | length 26.1
  Top Layer w0.2: v1(50.62,20.16) D1.L2.Y13@51.02,19.76
  Middle Layer 3 w0.1: X5.L1.20@40.965,3.32 ccw(c40.965,3.404) 41.025,3.345 41.65,3.97 ccw(c40.926,4.694) 41.95,4.694 41.95,5.44 cw(c42.986,5.441) 42.254,6.174 42.873,6.793 cw(c43.436,6.232) 43.436,7.027 48.83,7.027 ccw(c48.83,7.551) 49.2,7.18 49.98,7.96 ccw(c49.405,8.535) 50.218,8.535 50.218,12.4 50.218,12.45 ccw(c50.018,12.45) 50.018,12.65 49.924,12.65 cw(c49.924,12.85) 49.924,13.05 50.097,13.05 ccw(c50.097,13.25) 50.097,13.45 49.968,13.45 cw(c49.968,13.65) 49.968,13.85 50.018,13.85 ccw(c50.018,14.05) 50.218,14.05 50.218,16.785 50.218,19.584 cw(c50.639,19.584) 50.341,19.881 v1(50.62,20.16)
FPGA_BANK13.IO_L20P_T3_13: D1.L2.Y12 X5.L1.18 | length 26.1
  Top Layer w0.2: D1.L2.Y12@50.22,19.76 v1(50.62,19.36)
  Middle Layer 3 w0.1: X5.L1.18@42.965,3.32 ccw(c42.965,3.555) 43.131,3.389 43.779,4.036 ccw(c43.341,4.474) 43.96,4.474 43.96,5.562 ; 43.96,5.562 cw(c44.461,5.562) 44.107,5.917 44.59,6.4 cw(c45.072,5.919) 45.072,6.6 48.965,6.6 ccw(c48.965,7.191) 49.383,6.773 50.4,7.79 ccw(c49.869,8.321) 50.62,8.321 50.62,8.38 50.62,8.83 cw(c50.82,8.83) 50.82,9.03 51.045,9.03 ccw(c51.045,9.23) 51.045,9.43 50.792,9.43 cw(c50.792,9.63) 50.792,9.83 51.045,9.83 ccw(c51.045,10.03) 51.045,10.23 50.792,10.23 cw(c50.792,10.43) 50.792,10.63 51.045,10.63 ccw(c51.045,10.83) 51.045,11.03 50.792,11.03 cw(c50.792,11.23) 50.792,11.43 51.045,11.43 ccw(c51.045,11.63) 51.045,11.83 50.82,11.83 cw(c50.82,12.03) 50.62,12.03 50.62,12.54 v1(50.62,19.36)
FPGA_FORM.RST_FPGA: R18.L2.1 X8.L1.25 | length 2.5
  Bottom Layer w0.3: R18.L2.1@94.59,39.2 X8.L1.25@97.065,39.2
FPGA_JTAG.TCK: D1.L2.F9 X4.L1.6 | length 28.6
  Top Layer w0.2: v1(47.42,31.36) D1.L2.F9@47.82,30.96
  Middle Layer 3 w0.1: X4.L1.6@44.98,54.93 45.534,54.376 cw(c44.458,53.3) 45.98,53.3 45.98,53.096 ; 45.98,52.924 ccw(c47.544,52.924) 46.438,51.817 ccw(c47.856,53.237) 47.856,51.23 48.008,51.23 cw(c48.008,48.69) 49.804,50.486 49.93,50.36 cw(c49.061,49.491) 50.29,49.491 50.29,46.084 cw(c49.557,46.084) 50.075,45.565 49.34,44.83 ccw(c50.428,43.742) 48.889,43.742 48.889,32.417 cw(c48.163,32.417) 48.678,31.905 cw(c48.305,32.277) 48.305,31.75 ; 45.98,52.925 45.98,53.095 ; v1(47.42,31.36) 47.709,31.649 cw(c47.952,31.406) 47.952,31.75 48.304,31.75
FPGA_JTAG.TDI: D1.L2.G6 X4.L1.10 | length 30.4
  Top Layer w0.2: v1(45.02,30.56) D1.L2.G6@45.42,30.16
  Middle Layer 3 w0.1: v1(45.02,30.56) 45.363,30.217 ccw(c45.518,30.372) 45.518,30.153 48.062,30.153 ; 48.063,30.153 ccw(c48.063,31.217) 48.816,30.465 ccw(c47.311,31.97) 49.44,31.97 49.44,43.71 cw(c50.303,43.71) 49.693,44.32 50.623,45.25 ccw(c49.815,46.058) 50.958,46.058 50.958,50.598 ccw(c50.078,50.598) 50.7,51.22 cw(c52.366,52.886) 50.01,52.886 50.01,53.14 ccw(c48.175,53.14) 49.473,54.437 X4.L1.10@48.98,54.93
FPGA_JTAG.TDO: D1.L2.F6 X4.L1.8 | length 30.6
  Top Layer w0.2: v1(45.02,31.36) D1.L2.F6@45.42,30.96
  Middle Layer 3 w0.1: v1(45.02,31.36) 45.31,31.07 ccw(c45.588,31.348) 45.588,30.955 48.075,30.955 ccw(c48.076,32.021) 48.83,31.268 ccw(c48.03,32.066) 49.16,32.066 49.16,43.718 cw(c50.373,43.718) 49.516,44.576 50.3,45.361 ccw(c49.528,46.133) 50.62,46.133 50.62,49.556 ccw(c49.114,49.556) 50.179,50.621 49.627,51.173 ccw(c48.91,50.456) 48.91,51.47 cw(c48.91,52.493) 48.187,51.769 cw(c48.617,52.201) 48.008,52.201 ; X4.L1.8@46.98,54.93 47.582,54.328 cw(c46.554,53.3) 48.008,53.3 48.008,52.202
FPGA_JTAG.TMS: D1.L2.J6 X4.L1.4 | length 35.1
  Top Layer w0.2: v1(45.02,28.96) D1.L2.J6@45.42,28.56
  Middle Layer 3 w0.1: X4.L1.4@42.98,54.93 43.569,54.341 cw(c42.527,53.3) 44,53.3 44,53.202 ccw(c45.983,53.201) 44.58,51.799 ccw(c46.678,53.897) 46.678,50.93 ; 44.62,31.345 44.62,29.544 ccw(c45.063,29.544) 44.75,29.23 v1(45.02,28.96) ; 44.62,31.346 cw(c45.024,31.346) 45.024,31.75 46.771,31.75 ccw(c46.771,31.989) 46.94,31.82 ccw(c46.759,32.001) 47.015,32.001 47.015,32.294 cw(c47.279,32.294) 47.092,32.48 cw(c47.311,32.262) 47.311,32.571 48.336,32.571 48.34,32.571 ccw(c48.315,32.884) 48.629,32.884 48.629,43.771 cw(c50.509,43.771) 49.18,45.1 49.705,45.625 ccw(c49.066,46.264) 49.97,46.264 49.97,49.294 ccw(c48.604,49.294) 49.57,50.26 ccw(c47.952,48.642) 47.952,50.93 46.679,50.93
FPGA_SD_CARD.SD_CD: D1.L2.B14 R5.L6.2 R7.L6.1 | length 48.7
  Top Layer w0.1: R5.L6.2@20.26,60.94 20.26,60.661 20.26,60.66 ccw(c21.078,60.66) 20.5,60.082 ccw(c21.252,60.834) 21.252,59.77 21.253,59.77 22.131,59.77 22.132,59.77 cw(c22.132,58.618) 22.948,59.431 cw(c21.998,58.484) 23.34,58.484 v1(23.34,56.81) ; D1.L2.B14@51.82,34.16 v1(52.22,34.56)
  Top Layer w0.2: R5.L6.2@20.09,61.35 cw(c19.68,60.94) R5.L6.2@20.26,60.94
  Top Layer w0.3: R7.L6.1@18.32,61.35 R5.L6.2@20.09,61.35
  Middle Layer 1 w0.1: v1(23.34,56.81) 32.072,56.81 ; 32.073,56.81 cw(c32.073,54.712) 33.556,56.196 33.557,56.195 51.514,38.238 cw(c50.776,37.5) 51.82,37.5 51.82,35.17 ccw(c52.327,35.17) 51.968,34.812 v1(52.22,34.56)
FPGA_SD_CARD.SD_CLK: D1.L2.D14 D1.L6.9 | length 54.1
  Top Layer w0.1: D1.L6.9@22.41,56.28 23.04,56.28 cw(c23.04,55.29) 23.74,55.99 v1(23.87,55.86) ; D1.L2.D14@51.82,32.56 v1(52.22,32.96)
  Middle Layer 1 w0.1: v1(23.87,55.86) 32.658,55.86 ; 32.659,55.86 cw(c32.659,54.891) 33.343,55.577 33.345,55.575 36.735,52.185 37.053,51.867 cw(c36.912,51.726) 37.053,51.584 37.05,51.581 ccw(c37.192,51.44) 37.05,51.299 ccw(c37.192,51.44) 37.333,51.299 37.514,51.479 cw(c37.655,51.338) 37.797,51.479 cw(c37.655,51.338) 37.797,51.197 37.616,51.016 ccw(c37.757,50.874) 37.616,50.733 ccw(c37.757,50.874) 37.899,50.733 38.08,50.914 cw(c38.221,50.772) 38.363,50.914 cw(c38.221,50.772) 38.363,50.631 38.182,50.45 ccw(c38.323,50.309) 38.182,50.167 ccw(c38.323,50.309) 38.464,50.167 38.645,50.348 cw(c38.787,50.207) 38.928,50.348 cw(c38.787,50.207) 38.928,50.065 38.747,49.884 ccw(c38.889,49.743) 38.747,49.601 ccw(c38.889,49.743) 39.03,49.601 39.211,49.782 cw(c39.353,49.641) 39.494,49.782 cw(c39.353,49.641) 39.494,49.5 39.313,49.319 ccw(c39.454,49.177) 39.313,49.036 ccw(c39.454,49.177) 39.596,49.036 39.777,49.217 cw(c39.918,49.075) 40.06,49.217 cw(c39.918,49.075) 40.06,48.934 39.879,48.753 ccw(c40.02,48.612) 39.879,48.47 ccw(c40.02,48.612) 40.162,48.47 40.342,48.651 cw(c40.484,48.51) 40.625,48.651 cw(c40.484,48.51) 40.625,48.368 40.444,48.187 ccw(c40.586,48.046) 40.444,47.904 ccw(c40.586,48.046) 40.727,47.904 40.908,48.085 cw(c41.05,47.944) 41.191,48.085 cw(c41.05,47.944) 41.191,47.803 41.01,47.622 ccw(c41.151,47.48) 41.01,47.339 ccw(c41.151,47.48) 41.293,47.339 41.474,47.52 cw(c41.615,47.378) 41.757,47.52 cw(c41.615,47.378) 41.757,47.237 41.576,47.056 ccw(c41.717,46.914) 41.576,46.773 ccw(c41.717,46.914) 41.859,46.773 42.04,46.954 cw(c42.181,46.813) 42.322,46.954 cw(c42.181,46.813) 42.322,46.671 42.141,46.49 ccw(c42.283,46.349) 42.141,46.207 ccw(c42.283,46.349) 42.424,46.207 42.605,46.388 cw(c42.747,46.247) 42.888,46.388 cw(c42.747,46.247) 42.888,46.105 42.707,45.925 ccw(c42.849,45.783) 42.707,45.642 ccw(c42.849,45.783) 42.99,45.642 43.171,45.823 cw(c43.312,45.681) 43.454,45.823 cw(c43.312,45.681) 43.454,45.54 43.37,45.456 ccw(c43.512,45.315) 43.37,45.173 ccw(c43.512,45.315) 43.653,45.173 43.7,45.22 cw(c43.841,45.079) 43.983,45.22 cw(c43.841,45.079) 43.983,44.937 43.841,44.796 ccw(c43.983,44.654) 43.841,44.513 ccw(c43.983,44.654) 44.124,44.513 cw(c44.265,44.372) 44.407,44.513 44.687,44.233 50.574,38.346 50.575,38.345 cw(c49.55,37.319) 51,37.319 51,33.643 ccw(c51.273,33.643) 51.08,33.45 ccw(c51.297,33.667) 51.297,33.36 51.527,33.36 ; 51.528,33.36 cw(c51.528,32.654) 52.026,33.154 52.028,33.152 v1(52.22,32.96)
FPGA_SD_CARD.SD_CMD: D1.L2.C17 D1.L6.4 | length 54.1
  Top Layer w0.1: v1(20.72,53.7) D1.L6.4@20.72,54.63 ; D1.L2.C17@54.22,33.36 v1(54.62,33.76)
  Middle Layer 1 w0.1: v1(20.72,53.7) ccw(c20.72,54.304) 21.147,53.877 21.83,54.56 ccw(c20.985,55.405) 22.18,55.405 22.18,56.956 cw(c23.311,56.956) 22.511,57.755 cw(c23.488,56.778) 23.488,58.16 33.219,58.16 ; 33.22,58.16 cw(c33.22,56.64) 34.295,57.715 34.296,57.714 41.02,50.99 ccw(c41.161,51.131) 41.303,50.99 41.33,51.017 cw(c41.471,50.876) 41.613,51.017 cw(c41.471,50.876) 41.613,50.734 41.444,50.566 41.42,50.542 ccw(c41.562,50.4) 41.42,50.259 ccw(c41.562,50.4) 41.703,50.259 41.727,50.283 41.896,50.451 cw(c42.037,50.31) 42.178,50.451 cw(c42.037,50.31) 42.178,50.169 42.01,50 41.986,49.976 ccw(c42.128,49.835) 41.986,49.693 ccw(c42.128,49.835) 42.269,49.693 42.293,49.717 42.461,49.886 cw(c42.603,49.744) 42.744,49.886 cw(c42.603,49.744) 42.744,49.603 42.576,49.434 42.552,49.411 ccw(c42.693,49.269) 42.552,49.128 ccw(c42.693,49.269) 42.835,49.128 42.858,49.152 43.027,49.32 cw(c43.168,49.179) 43.31,49.32 cw(c43.168,49.179) 43.31,49.037 43.283,49.01 ccw(c43.424,48.869) 43.283,48.727 44.202,47.808 53.451,38.559 cw(c51.594,36.702) 54.22,36.702 54.22,34.34 ccw(c54.655,34.34) 54.347,34.033 v1(54.62,33.76)
FPGA_SD_CARD.SD_D0: D1.L2.E12 D1.L6.6 | length 54.1
  Top Layer w0.1: D1.L6.6@21.76,54.42 23.146,54.42 ccw(c23.146,55.444) v1(23.87,54.72) ; D1.L2.E12@50.22,31.76 v1(50.62,32.16)
  Middle Layer 1 w0.1: 23.67,54.72 v1@23.72,54.67 ; v1(23.87,54.72) 32.74,54.72 cw(c32.74,53.633) 33.508,54.402 33.509,54.401 34.039,53.871 34.075,53.835 ccw(c34.216,53.977) 34.357,53.835 34.366,53.844 cw(c34.507,53.703) 34.649,53.844 cw(c34.507,53.703) 34.649,53.561 34.52,53.432 ccw(c34.661,53.291) 34.52,53.149 ccw(c34.661,53.291) 34.802,53.149 34.932,53.278 cw(c35.073,53.137) 35.215,53.278 cw(c35.073,53.137) 35.215,52.996 35.085,52.866 ccw(c35.227,52.725) 35.085,52.583 ccw(c35.227,52.725) 35.368,52.583 35.497,52.713 cw(c35.639,52.571) 35.78,52.713 cw(c35.639,52.571) 35.78,52.43 35.651,52.301 ccw(c35.792,52.159) 35.651,52.018 ccw(c35.792,52.159) 35.934,52.018 36.063,52.147 cw(c36.204,52.006) 36.346,52.147 cw(c36.204,52.006) 36.346,51.864 36.337,51.856 ccw(c36.479,51.714) 36.337,51.573 36.729,51.181 44.09,43.82 44.125,43.785 ccw(c44.267,43.926) 44.408,43.785 44.434,43.811 cw(c44.576,43.669) 44.717,43.811 cw(c44.576,43.669) 44.717,43.528 44.423,43.234 ccw(c44.565,43.093) 44.423,42.951 ccw(c44.565,43.093) 44.706,42.951 45,43.245 cw(c45.141,43.104) 45.283,43.245 cw(c45.141,43.104) 45.283,42.962 44.989,42.668 ccw(c45.13,42.527) 44.989,42.386 ccw(c45.13,42.527) 45.272,42.386 45.566,42.679 cw(c45.707,42.538) 45.848,42.679 cw(c45.707,42.538) 45.848,42.397 45.555,42.103 ccw(c45.696,41.961) 45.555,41.82 ccw(c45.696,41.961) 45.837,41.82 46.131,42.114 cw(c46.273,41.972) 46.414,42.114 cw(c46.273,41.972) 46.414,41.831 46.12,41.537 ccw(c46.262,41.396) 46.12,41.254 ccw(c46.262,41.396) 46.403,41.254 46.697,41.548 cw(c46.838,41.407) 46.98,41.548 cw(c46.838,41.407) 46.98,41.265 46.686,40.971 ccw(c46.827,40.83) 46.686,40.689 ccw(c46.827,40.83) 46.969,40.689 47.263,40.982 cw(c47.404,40.841) 47.545,40.982 cw(c47.404,40.841) 47.545,40.7 47.252,40.406 ccw(c47.393,40.264) 47.252,40.123 ccw(c47.393,40.264) 47.535,40.123 47.828,40.417 cw(c47.97,40.275) 48.111,40.417 cw(c47.97,40.275) 48.111,40.134 47.872,39.895 ccw(c48.013,39.753) 47.872,39.612 ccw(c48.013,39.753) 48.155,39.612 48.368,39.825 cw(c48.509,39.684) 48.651,39.825 cw(c48.509,39.684) 48.651,39.542 ccw(c48.792,39.401) 48.651,39.259 49.725,38.185 49.868,38.042 cw(c49.043,37.216) 50.21,37.216 50.21,32.823 ccw(c50.82,32.823) 50.389,32.391 ; 50.389,32.391 v1@50.536,32.244 ; v1@50.571,32.279 cw(c50.451,32.16) v1(50.62,32.16)